# Altium PCB PCB1_ASCII.pcbdoc (part 2 of 3)
Units mm, origin at the board's own origin, x right, y up, seen from the top; angles counter-clockwise.
Board outline 135 x 100 mm, 4 copper layers (Top Layer, GND, VCC, Bottom Layer), stack 1.757 mm thick; 175 components, 160 nets, 705 pads, 758 vias.
Unrouted connection lines stored in the file: 8.
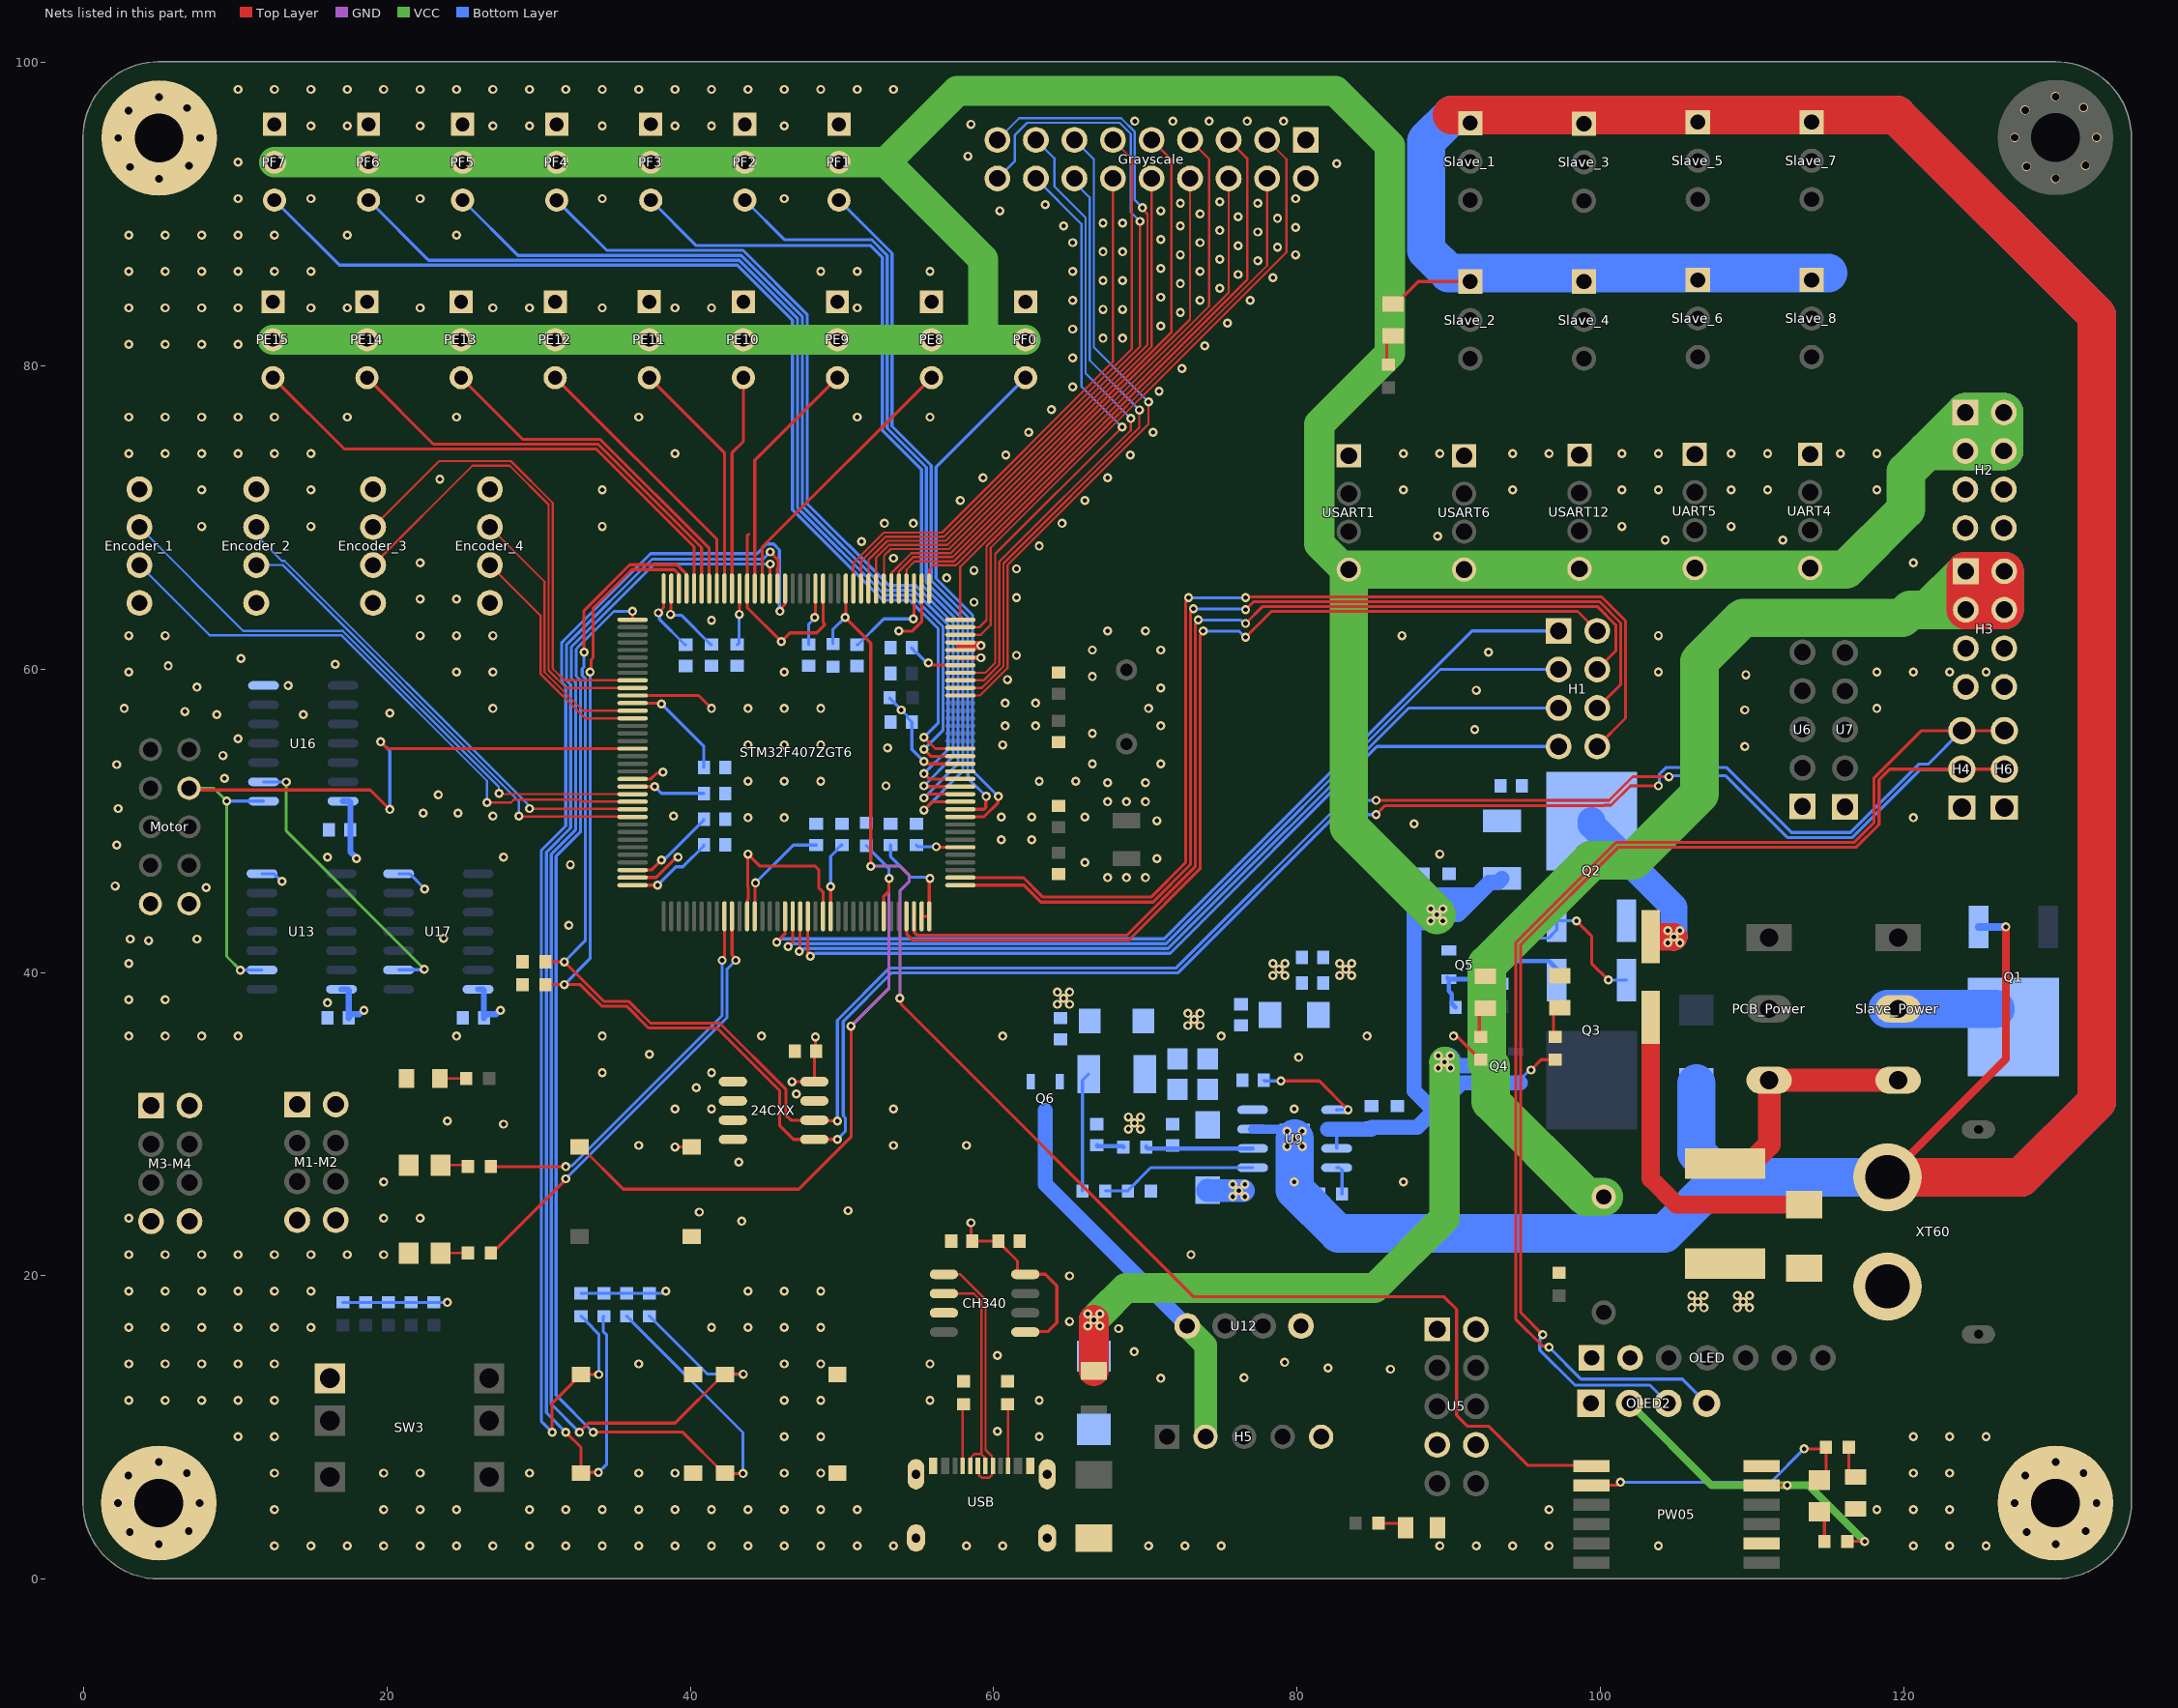
[diagram p4: the nets of this part, all layers, seen from the top]

## Via types
v1: diameter 0.6, hole 0.3, Top Layer to Bottom Layer, tented both sides, 722 vias
v2: diameter 0.6, hole 0.5, Top Layer to Bottom Layer, tented both sides, 24 vias
v3: diameter 0.6, hole 0.5, Top Layer to Bottom Layer, 8 vias
v4: diameter 0.61, hole 0.305, Top Layer to Bottom Layer, tented both sides, 4 vias

## Nets (pads, with @x,y where several pads share a name; then routed paths per layer and width w, separated by ;. In a path a pad name is that pad's centre, name@x,y a point inside that pad or via, vN(x,y) a via of type N, cw(c..) or ccw(c..) an arc to the next point about the centre after c; other vN are vias at no path point)
3V3A: C37.2 C38.2 Grayscale.1 L3.2 STM32F407ZGT6.32 STM32F407ZGT6.33 | length 1.4
  Top Layer w0.6: 57.803,61.539 v1(59.161,61.539)
  other v1: 82.8,39.8 83.6,39.8 83.2,40.2 82.8,40.6 83.6,40.6
3V3D: 24CXX.8 BOOT0.2 C7.2 C8.2 C9.2 C10.2 C11.2 C12.2 C13.2 C14.2 C15.2 C16.2 C17.2 C18.2 C19.2 C21.1 C33.2 C34.1 C35.1 C36.2 C39.1 C40.1 C41.1 CH340.5 CH340.8 D6.1 Encoder_1.1 Encoder_2.1 Encoder_3.1 Encoder_4.1 H3.1 H3.2 H3.3 H3.4 L2.2 L3.1 M1-M2.1 M1-M2.2 M3-M4.1 M3-M4.2 Motor.10 OLED2.2 OLED.2 OLED_Switch.1 PW05.5 Q6.2 R3.2 R6.2 R7.2 R8.2 R9.2 R10.2 R14.2 R16.2 R18.2 R19.2 R20.2 R21.2 R26.2 STM32F407ZGT6.6 STM32F407ZGT6.17 STM32F407ZGT6.30 STM32F407ZGT6.39 STM32F407ZGT6.52 STM32F407ZGT6.62 STM32F407ZGT6.72 STM32F407ZGT6.84 STM32F407ZGT6.95 STM32F407ZGT6.108 STM32F407ZGT6.121 STM32F407ZGT6.131 STM32F407ZGT6.143 STM32F407ZGT6.144 U5.7 U5.8 U13.14 U16.14 U17.14 | length 234.9
  Top Layer w0.2: STM32F407ZGT6.108@36.2,45.75 v1(37.85,45.75) ; STM32F407ZGT6.95@36.2,52.252 v1(37.652,52.252) ; STM32F407ZGT6.84@36.2,57.751 36.215,57.736 38.064,57.736 v1(38.1,57.7) ; v1(37.9,63.7) 38.25,64.05 STM32F407ZGT6.72@38.25,65.3 ; v1(39,28.5) BOOT0.2@40.101,28.5 ; v1(43.225,63.6) 43.238,63.613 43.238,65.287 STM32F407ZGT6.62@43.251,65.3 ; STM32F407ZGT6.121@44.249,43.7 44.264,43.715 44.264,45.864 v1(44.3,45.9) ; v1(46.7,32.8) 46.702,32.802 48.18,32.802 24CXX.8@48.182,32.805 48.182,34.684 C21.1@48.299,34.8 48.25,34.849 v1(48.25,35.75) ; v1(48.2,63.4) 48.25,63.45 STM32F407ZGT6.52@48.25,65.3 ; STM32F407ZGT6.131@49.25,43.7 v1(49.25,45.65) ; v1(54.7,63.3) 54.75,63.35 STM32F407ZGT6.39@54.75,65.3 ; STM32F407ZGT6.143@55.25,43.7 STM32F407ZGT6.144@55.75,43.7 55.75,46.15 v1(55.8,46.2) ; v1(55.4,53.9) 55.508,53.9 55.658,53.751 STM32F407ZGT6.17@57.8,53.751 ; v1(55.7,60.4) 55.808,60.4 55.958,60.251 STM32F407ZGT6.30@57.8,60.251 ; v1(56.215,48.285) 56.248,48.252 STM32F407ZGT6.6@57.8,48.252 ; v1(58.5,23.5) 58.5,22.399 C35.1@58.598,22.3 C34.1@60.301,22.3 60.301,22.25 61.565,20.987 61.565,20.304 61.764,20.105 CH340.8@62.082,20.105 63.395,20.105 64.163,19.338 64.163,16.913 63.589,16.339 62.127,16.339 CH340.5@62.082,16.295 ; v1(90.3,35.8) 90.377,35.723 90.597,35.723 92.072,34.248 R14.2@92.1,34.248 ; PW05.5@110.6,6.18 110.62,6.2 v1(112.3,6.2) ; R16.2@116.254,2.5 v1(117.4,2.5)
  Top Layer w2.54: H3.3@124.06,63.9 H3.4@126.6,63.9 H3.2@126.6,66.44 H3.1@124.06,66.44 H3.3@124.06,63.9
  VCC w0.5: OLED2.2@101.9,11.6 107.3,6.2 v1(112.3,6.2) 113.7,6.2 v1(117.4,2.5)
  VCC w2.54: OLED_Switch.1@100.2,25.21 99.04,25.21 92.75,31.5 92.75,33.828 92.5,34.078 92.5,40.5 99.382,47.382 102.132,47.382 106.5,51.75 106.5,60.5 109.37,63.37 119.87,63.37 120.4,63.9 121.52,63.9 ; 121.52,63.9 H3.3@124.06,63.9 ; 121.52,63.9 H3.1@124.06,66.44 ; H3.3@124.06,63.9 H3.1@124.06,66.44 ; H3.3@124.06,63.9 H3.4@126.6,63.9 H3.2@126.6,66.44 H3.1@124.06,66.44
  Bottom Layer w0.2: R9.2@17.1,18.254 R10.2@18.6,18.254 R7.2@20.1,18.254 R8.2@21.6,18.254 R6.2@23.1,18.254 23.104,18.25 v1(24,18.25) ; R18.2@32.8,18.854 R19.2@34.3,18.854 R21.2@35.8,18.854 R20.2@37.3,18.854 38.246,18.854 v1(38.392,19) ; v1(37.652,52.252) 37.652,52.248 38.1,51.8 C15.2@40.899,51.8 ; v1(37.85,45.75) 39.063,46.963 39.515,46.963 40.902,48.35 C16.2@40.902,48.4 ; v1(37.9,63.7) 37.977,63.623 37.977,63.272 39.65,61.599 C13.2@39.7,61.599 ; v1(38.1,57.7) 40.899,54.901 C14.2@40.899,53.5 ; C12.2@43.1,61.601 43.225,61.726 v1(43.225,63.6) ; v1(44.3,45.9) 46.799,48.399 C17.2@48.3,48.399 ; C11.2@47.8,61.601 47.8,62.951 48.2,63.351 v1(48.2,63.4) ; v1(49.25,45.65) 49.25,47.649 49.65,48.049 49.65,48.099 49.95,48.399 C18.2@50,48.399 ; C10.2@51,61.599 51.05,61.599 52.751,63.3 v1(54.7,63.3) ; R3.2@53.146,58.1 53.146,58.072 54.301,56.917 54.301,56.8 C8.2@54.601,56.5 54.601,54.699 v1(55.4,53.9) ; C19.2@53.2,48.402 53.2,47.635 54.559,46.277 55.723,46.277 v1(55.8,46.2) ; C9.2@54.598,61.4 54.598,61.35 54.899,61.05 54.948,61.05 55.598,60.4 v1(55.7,60.4) ; C7.2@54.9,48.402 55.017,48.285 v1(56.215,48.285) ; R26.2@65.848,25.6 65.848,32.897 L2.2@66.251,33.3
  Bottom Layer w0.4: U13.14@17.019,38.89 17.421,38.89 17.501,38.81 C39.1@17.501,37.05 ; U16.14@17.119,51.29 17.521,51.29 17.601,51.21 C40.1@17.601,49.4 17.601,47.953 18,47.554 v1(18,47.5) ; C39.1@17.501,37 C39.1@17.501,37.05 ; v1(18.5,37.5) 18.446,37.5 18.195,37.25 17.701,37.25 C39.1@17.501,37.05 ; U17.14@26.019,38.89 26.321,38.89 26.401,38.81 C41.1@26.401,37.05 ; C41.1@26.401,37 C41.1@26.401,37.05 ; v1(27.5,37.5) 27.446,37.5 27.195,37.25 26.601,37.25 C41.1@26.401,37.05
  other v1: 64.2,37.9 65,37.9 64.6,38.3 64.2,38.7 65,38.7 53.9,57.3
3V3IN: H5.2 Q6.3 U12.1 | length 25.9
  VCC w1.5: U12.1@72.751,16.7 72.751,16.646 73.96,15.437 H5.2@73.96,9.4
  Bottom Layer w1: Q6.3@63.4,30.9 Q6.3@63.4,30.598 63.4,26.051 U12.1@72.751,16.7
$1N10: C4.1 STM32F407ZGT6.106 | length 6.1
  Top Layer w0.2: STM32F407ZGT6.106@36.2,46.75 36.215,46.766 37.466,46.766 v1(38.1,47.4)
  Bottom Layer w0.2: v1(38.1,47.4) 38.177,47.477 38.325,47.477 40.899,50.05 C4.1@40.899,50.1
$1N11: C3.1 STM32F407ZGT6.71 | length 5.2
  Top Layer w0.2: v1(38.7,63.6) 38.735,63.635 38.735,65.285 STM32F407ZGT6.71@38.75,65.3
  Bottom Layer w0.2: v1(38.7,63.6) 38.748,63.552 39.4,63.552 41.35,61.601 C3.1@41.4,61.601
$1N48: F1.2 PCB_Power.3 Slave_Power.3 | length 16.2
  Top Layer w1.5: F1.2@108.2,27.399 109.851,27.399 111.1,28.648 PCB_Power.3@111.1,32.9 Slave_Power.3@119.6,32.9
$1N49: D1.1 F1.1 XT60.2
  other v1: 106,17.9 106.8,17.9 109,17.9 109.8,17.9 106.4,18.3 109.4,18.3 106,18.7 106.8,18.7 109,18.7 109.8,18.7
$1N52: C28.2 U9.1 | length 7.1
  Top Layer w0.2: v1(78.925,32.85) 81.45,32.85 v1(83.35,30.95)
  Bottom Layer w0.2: C28.2@77.801,32.9 77.851,32.85 v1(78.925,32.85) ; U9.1@82.6,30.94 82.61,30.95 v1(83.35,30.95)
$1N53: C28.1 C29.2 C32.2 D5.2 L2.1 U9.8
$1N54: R22.1 U9.4 | length 2
  Bottom Layer w0.2: U9.4@82.6,27.13 82.782,27.13 82.954,26.957 R22.1@82.954,25.4
$1N57: R26.1 R27.2 U9.5 | length 10.4
  Bottom Layer w0.2: R26.1@67.354,25.6 R27.2@68.848,25.6 68.848,25.628 70.35,27.13 U9.5@77.06,27.13
$1N58: C31.2 R25.1 | length 1.8
  Bottom Layer w0.3: C31.2@66.8,28.601 66.851,28.551 68.495,28.551 R25.1@68.546,28.5
$1N59: C30.2 R25.2 U9.6 | length 7
  Bottom Layer w0.3: R25.2@70.054,28.5 70.154,28.4 74.3,28.4 U9.6@77.06,28.4
$1N309: LED4.1 R12.1 | length 2.1
  Top Layer w0.2: R12.1@85.9,80.054 85.9,81.548 LED4.1@86.3,81.948
$1N314: LED5.1 R13.1 | length 1.9
  Top Layer w0.2: R13.1@85.354,3.7 86.848,3.7 LED5.1@87.148,3.4
$1N317: LED6.1 R14.1 | length 2.1
  Top Layer w0.2: R14.1@92,35.754 92,37.248 LED6.1@92.4,37.648
$1N321: LED7.2 R15.1 | length 1.7
  Top Layer w0.15: LED7.2@23.5,33 R15.1@25.246,33
$1N334: Q1.2 Slave_Power.2 | length 7.1
  Bottom Layer w2.54: Slave_Power.2@118.9,37.6 Q1.2@126.008,37.6
$1N339: LED3.1 R11.1 | length 2.1
  Top Layer w0.2: R11.1@96.9,35.787 96.9,37.281 LED3.1@97.3,37.681
$1N428: LED1.1 R4.1 | length 1.8
  Top Layer w0.15: LED1.1@23.552,27.3 25.246,27.3 R4.1@25.346,27.2
$1N431: LED2.1 R5.1 | length 1.8
  Top Layer w0.15: LED2.1@23.652,21.5 R5.1@25.446,21.5
$1N508: D3.1 F2.2 Q4.3 | length 45
  Top Layer w2: F2.2@66.6,13.745 v1(66.6,17.1)
  VCC w2: v1(66.6,17.1) v1(67,17.5) 68.7,19.2 85.1,19.2 89.7,23.8 v1(89.7,34.1)
  Bottom Layer w1: v1(89.7,34.1) 89.95,33.85 Q4.3@92.198,33.85 Q4.3@92.6,33.85
  Bottom Layer w2: D3.1@66.6,14.713 v1(66.6,17.1) ; v1(89.7,34.1) v1@89.8,34.1
  other v1: 66.2,16.7 67,16.7 66.2,17.5 89.3,33.7 90.1,33.7 89.3,34.5 90.1,34.5
$1N509: Q2.1 Q3.1 Q5.3 R32.1 | length 6.2
  Bottom Layer w0.3: Q5.3@91.998,40.5 92.122,40.624 93.376,40.624 R32.1@93.5,40.748 96.584,40.748 97.099,40.233 Q3.1@97.099,39.484
$1N510: Q5.1 R30.2 R31.1 | length 5.8
  Bottom Layer w0.3: Q5.1@89.901,39.648 Q5.1@89.999,39.55 ; R30.2@90.446,37.7 90.192,37.954 90.192,38.582 89.999,38.775 Q5.1@89.999,39.55 ; R31.1@93.5,39.252 92.06,39.252 91.762,39.55 Q5.1@89.999,39.55
$1N514: Q2.3 Q3.3 R32.2 | length 11.7
  Top Layer w0.2: v1(98.4,43.4) 99.4,42.4 99.4,40.6 v1(100.5,39.5)
  Bottom Layer w0.2: R32.2@93.5,42.254 96.55,42.254 97.1,42.805 Q2.3@97.1,43.4 v1(98.4,43.4) ; v1(100.5,39.5) 101.682,39.5 Q3.3@101.699,39.484
$1N515: C22.1 C23.2 L1.1 Q2.2 | length 11.1
  Top Layer w1.8: C22.1@103.65,42.35 v1(104.825,42.35)
  Bottom Layer w1.8: Q2.2@99.399,49.984 99.399,49.733 104.825,44.307 v1(104.825,42.35)
  other v1: 104.425,41.95 105.225,41.95 104.425,42.75 105.225,42.75
$1N522: LED8.2 PW05.8 R33.2 | length 18.8
  Top Layer w0.2: PW05.8@99.399,6.18 99.419,6.2 101.096,6.2 101.296,6.4 v1(101.3,6.4) ; v1(113.4,8.6) 114.746,8.6 R33.2@114.846,8.7 114.846,6.997 LED8.2@114.4,6.552
  Bottom Layer w0.2: v1(101.3,6.4) 111.2,6.4 v1(113.4,8.6)
$1N532: LED8.1 R16.1 | length 2.1
  Top Layer w0.2: LED8.1@114.4,4.451 114.746,4.105 R16.1@114.746,2.5
$1N534: LED9.1 R33.1 | length 2.2
  Top Layer w0.2: R33.1@116.352,8.7 116.352,7.149 116.752,6.749 LED9.1@116.8,6.749
$1N629: 
$1N630: 
+5V: C24.2 C25.2 C26.2 C27.2 H2.1 H2.2 H2.3 H2.4 L1.2 PE8.2 PE9.2 PE10.2 PE11.2 PE12.2 PE13.2 PE14.2 PE15.2 PF0.2 PF1.2 PF2.2 PF3.2 PF4.2 PF5.2 PF6.2 PF7.2 Q4.2 R11.2 U9.2 U9.3 UART4.4 UART5.4 USART1.4 USART6.4 USART12.4 | length 313.2
  Top Layer w0.2: v1(95.4,33.568) 96.081,34.248 R11.2@97,34.248
  VCC w2: PE15.2@12.5,81.7 59.3,81.7 ; PF7.2@12.6,93.4 PF6.2@18.8,93.4 PF5.2@25,93.4 PF4.2@31.2,93.4 PF3.2@37.4,93.4 PF2.2@43.6,93.4 PF1.2@49.8,93.4 52.9,93.4 ; PF0.2@62.1,81.7 59.3,81.7 ; USART1.4@83.4,66.551 83.141,66.551 81.45,68.243 81.45,76.15 86.1,80.8 86.1,94.5 82.5,98.1 57.6,98.1 52.9,93.4 ; 52.9,93.4 59.3,87 59.3,81.7
  VCC w2.54: v1(89.2,43.8) 83.4,49.6 USART1.4@83.4,66.551 USART6.4@91,66.551 116.151,66.551 120.115,70.515 120.115,72.995 121.49,74.37 ; 121.49,74.37 H2.1@124.03,76.91 ; 121.49,74.37 H2.3@124.03,74.37 ; H2.3@124.03,74.37 H2.1@124.03,76.91 ; H2.3@124.03,74.37 H2.4@126.57,74.37 H2.2@126.57,76.91 H2.1@124.03,76.91
  Bottom Layer w0.2: U9.3@82.6,28.4 U9.2@82.6,29.67 ; Q4.2@94.4,32.9 94.653,32.9 95.3,33.547 v1@95.3,33.6
  Bottom Layer w1: U9.2@82,29.67 U9.2@82.6,29.67 C27.2@84.9,29.67 ; C27.2@84.9,29.799 87.908,29.799 89.004,30.896 ; C24.2@90,45.101 90.5,45.1 ; C24.2@90,45.101 C25.2@88.3,45.101 87.7,44.501 87.7,32.2 89.004,30.896 ; L1.2@93.5,46.2 93.249,45.95 L1.2@92.75,45.95 ; Q4.2@94.7,32.73 90.839,32.73 89.004,30.896 ; 90.5,45.1 v1(89.6,44.2) v1(89.2,43.8) 90.601,43.8 L1.2@92.75,45.95 ; 90.5,45.1 91.8,45.1 92.65,45.95 L1.2@92.75,45.95
  Bottom Layer w2: 88.202,43.774 89.174,43.774 v1(89.2,43.8) 89.2,44.5 89.1,44.6
  Bottom Layer w2.54: H2.3@124.03,74.37 H2.1@124.03,76.91 H2.2@126.57,76.91 H2.4@126.57,74.37 H2.3@124.03,74.37
  other v1: 88.8,43.4 89.6,43.4 88.8,44.2
AD0: Grayscale.3 STM32F407ZGT6.34 | length 42.8
  Top Layer w0.15: STM32F407ZGT6.34@57.8,62.252 59.152,62.252 59.8,62.9 59.8,67.982 79.29,87.472 79.29,93.6 Grayscale.3@78.02,94.87
AD1: Grayscale.4 STM32F407ZGT6.35 | length 38.7
  Top Layer w0.15: STM32F407ZGT6.35@57.8,62.75 59.05,62.75 59.53,63.23 59.53,68.093 78.02,86.583 Grayscale.4@78.02,92.33
AD2: Grayscale.5 STM32F407ZGT6.36 | length 40
  Top Layer w0.15: STM32F407ZGT6.36@57.8,63.25 57.8,66.745 76.7,85.645 76.7,93.65 Grayscale.5@75.48,94.87
AD3: Grayscale.6 STM32F407ZGT6.37 | length 36.1
  Top Layer w0.15: STM32F407ZGT6.37@55.75,65.3 55.75,66.55 56.03,66.83 57.503,66.83 75.48,84.807 Grayscale.6@75.48,92.33
AD4: Grayscale.7 STM32F407ZGT6.40 | length 39.9
  Top Layer w0.15: STM32F407ZGT6.40@54.249,65.3 54.249,66.549 54.8,67.1 57.391,67.1 74.2,83.909 74.2,93.61 Grayscale.7@72.94,94.87
AD5: Grayscale.8 STM32F407ZGT6.41 | length 36.5
  Top Layer w0.15: STM32F407ZGT6.41@53.751,65.3 53.751,66.433 54.688,67.37 57.279,67.37 72.94,83.031 Grayscale.8@72.94,92.33
AD6: Grayscale.9 STM32F407ZGT6.42 | length 39.3
  Top Layer w0.15: STM32F407ZGT6.42@53.251,65.3 53.276,65.325 53.276,66.339 54.576,67.64 57.167,67.64 71.7,82.173 71.7,93.57 Grayscale.9@70.4,94.87
AD7: Grayscale.10 STM32F407ZGT6.43 | length 36.6
  Top Layer w0.15: STM32F407ZGT6.43@52.751,65.3 52.775,65.325 52.775,67.475 53.21,67.91 57.056,67.91 70.4,81.254 Grayscale.10@70.4,92.33
AD8: Grayscale.11 STM32F407ZGT6.46 | length 39.7
  Top Layer w0.15: STM32F407ZGT6.46@51.249,65.3 51.249,67.095 52.874,68.72 56.72,68.72 69.1,81.1 69.1,93.63 Grayscale.11@67.86,94.87
AD9: Grayscale.12 STM32F407ZGT6.47 | length 36.4
  Top Layer w0.15: STM32F407ZGT6.47@50.749,65.3 50.749,66.976 52.763,68.99 56.59,68.99 67.86,80.26 Grayscale.12@67.86,92.33
AD10: Grayscale.13 STM32F407ZGT6.26 | length 44.5
  Top Layer w0.15: STM32F407ZGT6.26@57.8,58.252 59.097,58.252 60.91,60.064 60.91,66.846 70.2,76.136 v1(70.2,77.6)
  Bottom Layer w0.15: Grayscale.13@65.32,94.87 66.6,93.59 66.6,81.2 v1(70.2,77.6)
AD11: Grayscale.14 STM32F407ZGT6.27 | length 41.1
  Top Layer w0.15: STM32F407ZGT6.27@57.8,58.752 59.216,58.752 60.64,60.176 60.64,66.958 69.595,75.913 v1(69.595,77.077)
  Bottom Layer w0.15: Grayscale.14@65.32,92.33 65.32,92.08 66.33,91.07 66.33,80.342 v1(69.595,77.077)
AD12: Grayscale.15 STM32F407ZGT6.28 | length 43.8
  Top Layer w0.15: STM32F407ZGT6.28@57.8,59.25 59.332,59.25 60.37,60.288 60.37,67.07 69.029,75.729 v1(69.029,76.511)
  Bottom Layer w0.15: Grayscale.15@62.78,94.87 64,93.65 64,91.8 66.06,89.74 66.06,79.48 v1(69.029,76.511)
AD13: Grayscale.16 STM32F407ZGT6.29 | length 40.3
  Top Layer w0.15: STM32F407ZGT6.29@57.8,59.75 57.802,59.748 59.448,59.748 60.1,60.4 60.1,67.582 v1(68.459,75.941)
  Bottom Layer w0.15: Grayscale.16@62.78,92.33 65.79,89.32 65.79,78.61 v1(68.459,75.941)
AD14: Grayscale.17 STM32F407ZGT6.44 | length 50.1
  Top Layer w0.15: STM32F407ZGT6.44@52.25,65.3 52.25,67.332 53.098,68.18 56.944,68.18 70.13,81.366 70.13,89.988 69.8,90.318 v1(69.8,90.4)
  Bottom Layer w0.15: Grayscale.17@60.243,94.87 61.673,96.3 68.4,96.3 69.3,95.4 69.3,90.9 v1(69.8,90.4)
AD15: Grayscale.18 STM32F407ZGT6.45 | length 51.5
  Top Layer w0.15: STM32F407ZGT6.45@51.75,65.3 51.75,67.213 52.986,68.45 56.832,68.45 69.635,81.253 v1(69.635,89.5)
  Bottom Layer w0.15: Grayscale.18@60.243,92.33 61.4,93.487 61.4,95.2 62.2,96 68.3,96 69.03,95.27 69.03,90.105 v1(69.635,89.5)
BOOT0: BOOT0.1 R2.1 STM32F407ZGT6.138 | length 44
  Top Layer w0.2: BOOT0.1@32.699,28.5 32.798,28.5 35.578,25.72 47.155,25.72 50.6,29.165 v1(50.6,36.46) ; STM32F407ZGT6.138@52.751,43.7 52.751,45.015 53.1,45.365 v1(53.1,46.2)
  GND w0.2: v1(50.6,36.46) 53.1,38.96 v1(53.1,46.2)
  Bottom Layer w0.2: R2.1@51.6,48.346 51.628,48.346 51.932,48.042 51.932,48.014 53.1,46.846 v1(53.1,46.2)
BOOT1_AT: PW05.7 R1.1 STM32F407ZGT6.48 | length 94.9
  Top Layer w0.2: STM32F407ZGT6.48@50.251,65.3 50.251,63.451 v1(50.2,63.4) 51.9,61.7 v1(51.9,47) ; v1(53.8,38.3) 53.877,38.223 53.877,37.929 73.185,18.62 89.68,18.62 90.5,17.8 90.5,10.8 91.2,10.1 92.617,10.1 95.217,7.5 99.349,7.5 PW05.7@99.399,7.45
  GND w0.2: v1(51.9,47) 53.835,47 54.42,46.415 54.42,45.985 53.835,45.4 53.835,38.335 v1(53.8,38.3)
  Bottom Layer w0.2: R1.1@49.4,61.654 49.4,62.6 v1(50.2,63.4)
CC1: R28.1 USB.A5 | length 4.1
  Top Layer w0.15: USB.A5@57.95,7.475 57.95,11.498 R28.1@58,11.548
CC2: R29.1 USB.B5 | length 4.1
  Top Layer w0.15: R29.1@60.9,11.548 60.95,11.498 USB.B5@60.95,7.475
Digital_IN1: PE8.3 STM32F407ZGT6.59 | length 18.5
  Top Layer w0.2: STM32F407ZGT6.59@44.75,65.3 44.75,68.05 PE8.3@55.9,79.201
Digital_IN2: PE9.3 STM32F407ZGT6.60 | length 16.2
  Top Layer w0.2: STM32F407ZGT6.60@44.249,65.3 44.249,73.75 PE9.3@49.7,79.201
Digital_IN3: PE10.3 STM32F407ZGT6.63 | length 14.2
  Top Layer w0.2: STM32F407ZGT6.63@42.751,65.3 42.751,74.251 43.5,75 PE10.3@43.5,79.201
Digital_IN4: PE11.3 STM32F407ZGT6.64 | length 16
  Top Layer w0.2: PE11.3@37.3,79.201 42.25,74.25 STM32F407ZGT6.64@42.25,65.3
Digital_IN5: PE12.3 STM32F407ZGT6.65 | length 18.3
  Top Layer w0.2: PE12.3@31.1,79.198 41.75,68.548 STM32F407ZGT6.65@41.75,65.3
Digital_IN6: PE13.3 STM32F407ZGT6.66 | length 23.7
  Top Layer w0.2: PE13.3@24.9,79.201 28.961,75.14 34.065,75.14 41.249,67.956 STM32F407ZGT6.66@41.249,65.3
Digital_IN7: PE14.3 STM32F407ZGT6.67 | length 29.4
  Top Layer w0.2: PE14.3@18.7,79.201 23.081,74.82 33.933,74.82 40.749,68.003 STM32F407ZGT6.67@40.749,65.3
Digital_IN8: PE15.3 STM32F407ZGT6.68 | length 35.1
  Top Layer w0.2: PE15.3@12.5,79.201 17.201,74.5 33.8,74.5 40.251,68.049 STM32F407ZGT6.68@40.251,65.3
Digital_IN9: PF0.3 STM32F407ZGT6.10 | length 35
  Top Layer w0.2: STM32F407ZGT6.10@57.8,50.251 57.815,50.266 59.366,50.266 60.276,51.176 60.276,51.576 v1(60.3,51.6)
  Bottom Layer w0.2: v1(60.3,51.6) 58.6,53.3 58.6,63.565 56.2,65.965 56.2,73.301 PF0.3@62.1,79.201
Digital_IN10: PF1.3 STM32F407ZGT6.11 | length 45.8
  Top Layer w0.2: STM32F407ZGT6.11@57.8,50.751 59.351,50.751 59.476,50.876 59.476,51.576 v1(59.5,51.6)
  Bottom Layer w0.2: PF1.3@49.8,90.901 53.3,87.401 53.3,76 55.88,73.42 55.88,65.832 58.28,63.432 58.28,53.167 58.3,53.147 58.3,52.8 v1(59.5,51.6)
Digital_IN11: PF2.3 STM32F407ZGT6.12 | length 53.2
  Top Layer w0.2: v1(55.4,50.7) 55.951,51.251 STM32F407ZGT6.12@57.8,51.251
  Bottom Layer w0.2: PF2.3@43.6,90.901 46.201,88.3 51.948,88.3 52.98,87.268 52.98,75.867 55.56,73.287 55.56,65.7 57.96,63.3 57.96,53.26 v1(55.4,50.7)
Digital_IN12: PF3.3 STM32F407ZGT6.13 | length 58
  Top Layer w0.2: v1(55.4,51.5) 55.508,51.5 55.76,51.752 STM32F407ZGT6.13@57.8,51.752
  Bottom Layer w0.2: PF3.3@37.4,90.901 40.401,87.9 51.896,87.9 52.66,87.136 52.66,75.735 55.24,73.155 55.24,65.567 57.64,63.167 57.64,53.74 v1(55.4,51.5)
Digital_IN13: PF4.3 STM32F407ZGT6.14 | length 58.9
  Top Layer w0.2: v1(55.4,52.3) 55.448,52.252 STM32F407ZGT6.14@57.8,52.252
  Bottom Layer w0.2: PF4.3@31.2,90.898 34.518,87.58 43.5,87.58 47.7,83.38 47.7,70.9 53.1,65.5 54.854,65.5 57.32,63.034 57.32,54.22 v1(55.4,52.3)
Digital_IN14: PF5.3 STM32F407ZGT6.15 | length 63.9
  Top Layer w0.2: v1(55.4,53.1) 55.75,52.75 STM32F407ZGT6.15@57.8,52.75
  Bottom Layer w0.2: PF5.3@25,90.901 28.641,87.26 43.367,87.26 47.38,83.247 47.38,70.767 52.967,65.18 54.722,65.18 56.99,62.912 56.99,54.69 v1(55.4,53.1)
Digital_IN15: PF6.3 STM32F407ZGT6.18 | length 68
  Top Layer w0.2: v1(55.4,54.7) 55.849,54.251 STM32F407ZGT6.18@57.8,54.251
  Bottom Layer w0.2: PF6.3@18.8,90.901 22.761,86.94 43.235,86.94 47.06,83.115 47.06,70.635 52.835,64.86 54.589,64.86 56.67,62.78 56.67,55.97 v1(55.4,54.7)
Digital_IN16: PF7.3 STM32F407ZGT6.19 | length 73
  Top Layer w0.2: v1(55.4,55.5) 56.149,54.751 STM32F407ZGT6.19@57.8,54.751
  Bottom Layer w0.2: PF7.3@12.6,90.901 16.881,86.62 43.102,86.62 46.74,82.982 46.74,70.502 52.702,64.54 54.457,64.54 56.35,62.647 56.35,56.45 v1(55.4,55.5)
Digital_OUT1: H1.2 STM32F407ZGT6.141 | length 65.7
  Top Layer w0.2: STM32F407ZGT6.141@54.249,43.7 54.264,43.685 54.264,42.536 54.67,42.13 68.893,42.13 73.6,46.837 73.6,62.192 73.8,62.392 v1(73.8,62.5) ; v1(76.6,62.1) 78.3,63.8 98.48,63.8 H1.2@99.77,62.51
  Bottom Layer w0.2: v1(73.8,62.5) 76.152,62.5 76.552,62.1 v1(76.6,62.1)
Digital_OUT2: H1.4 STM32F407ZGT6.142 | length 69.9
  Top Layer w0.2: STM32F407ZGT6.142@54.75,43.7 54.765,43.685 54.765,42.635 54.95,42.45 68.761,42.45 73.28,46.97 73.28,62.925 73.48,63.125 v1(73.48,63.234) ; v1(76.6,63) 77.72,64.12 99.78,64.12 101,62.9 101,61.2 H1.4@99.77,59.97
  Bottom Layer w0.2: v1(73.48,63.234) 76.258,63.234 76.492,63 v1(76.6,63)
Digital_OUT3: H1.6 STM32F407ZGT6.1 | length 68.8
  Top Layer w0.2: STM32F407ZGT6.1@57.8,45.75 61.993,45.75 63.102,44.64 70.498,44.64 72.96,47.102 72.96,63.659 73.16,63.859 v1(73.16,63.967) ; v1(76.6,63.9) 77.14,64.44 99.913,64.44 101.32,63.033 101.32,58.98 H1.6@99.77,57.43
  Bottom Layer w0.2: v1(73.16,63.967) 76.533,63.967 v1(76.6,63.9)
Digital_OUT4: H1.8 STM32F407ZGT6.2 | length 72.4
  Top Layer w0.2: STM32F407ZGT6.2@57.8,46.25 61.945,46.25 63.235,44.96 70.365,44.96 72.64,47.235 72.64,64.392 72.84,64.592 v1(72.84,64.7) ; v1(76.6,64.7) 76.66,64.76 100.045,64.76 101.64,63.165 101.64,56.76 H1.8@99.77,54.89
  Bottom Layer w0.2: v1(72.84,64.7) v1(76.6,64.7)
Digital_OUT5: H1.1 STM32F407ZGT6.125 | length 62
  Top Layer w0.2: v1(45.7,42) 46.236,42.536 46.236,43.685 STM32F407ZGT6.125@46.251,43.7
  Bottom Layer w0.2: v1(45.7,42) 45.797,42 46.017,42.22 71.231,42.22 91.521,62.51 H1.1@97.23,62.51
Digital_OUT6: H1.3 STM32F407ZGT6.126 | length 60.5
  Top Layer w0.2: v1(46.442,41.7) 46.442,41.708 46.751,42.017 STM32F407ZGT6.126@46.751,43.7
  Bottom Layer w0.2: v1(46.442,41.7) 46.55,41.7 46.75,41.9 71.363,41.9 89.433,59.97 H1.3@97.23,59.97
Digital_OUT7: H1.5 STM32F407ZGT6.127 | length 59.1
  Top Layer w0.2: v1(47.175,41.38) 47.234,41.439 47.234,43.685 STM32F407ZGT6.127@47.249,43.7
  Bottom Layer w0.2: v1(47.175,41.38) 47.283,41.38 47.483,41.58 71.496,41.58 87.346,57.43 H1.5@97.23,57.43
Digital_OUT8: H1.7 STM32F407ZGT6.128 | length 57.8
  Top Layer w0.2: STM32F407ZGT6.128@47.749,43.7 47.749,41.327 47.908,41.168 v1(47.908,41.06)
  Bottom Layer w0.2: v1(47.908,41.06) 48.016,41.06 48.216,41.26 71.629,41.26 85.258,54.89 H1.7@97.23,54.89
DN_N: CH340.2 USB.A7 USB.B7 | length 15
  Top Layer w0.15: CH340.2@56.718,18.835 58.683,18.835 59.194,18.324 59.194,8.25 ; USB.B7@58.451,7.475 58.526,7.55 58.526,8.067 58.708,8.25 59.194,8.25 ; USB.A7@59.451,7.475 59.377,7.55 59.377,8.067 59.194,8.25
DP_P: CH340.1 USB.A6 USB.B6 | length 16.8
  Top Layer w0.15: CH340.1@56.718,20.105 56.723,20.1 57.8,20.1 59.464,18.436 59.464,8.536 59.879,8.121 59.879,7.547 USB.B6@59.952,7.475 59.877,7.4 59.877,6.882 59.695,6.7 59.208,6.7 59.026,6.882 59.026,7.4 USB.A6@58.951,7.475
Encoder1_A: Encoder_1.2 STM32F407ZGT6.96 | length 40
  Top Layer w0.15: v1(27.4,51.8) 27.448,51.752 STM32F407ZGT6.96@36.2,51.752
  Bottom Layer w0.15: Encoder_1.2@3.7,69.35 10.55,62.5 17.118,62.5 27.388,52.23 27.388,51.812 v1(27.4,51.8)
Encoder1_B: Encoder_1.3 STM32F407ZGT6.97 | length 40
  Top Layer w0.15: v1(26.6,51.2) 28.2,51.2 28.4,51.4 32.673,51.4 32.822,51.251 STM32F407ZGT6.97@36.2,51.251
  Bottom Layer w0.15: Encoder_1.3@3.7,66.85 8.32,62.23 17.006,62.23 26.6,52.636 v1(26.6,51.2)
Encoder2_A: Encoder_2.2 STM32F407ZGT6.98 | length 32.9
  Top Layer w0.15: v1(29.4,50.8) 29.425,50.775 36.175,50.775 STM32F407ZGT6.98@36.2,50.751
  Bottom Layer w0.15: Encoder_2.2@11.4,69.35 11.696,69.053 11.696,68.504 13.08,67.12 13.262,67.12 29.27,51.112 29.27,51.052 29.4,50.922 v1(29.4,50.8)
Encoder2_B: Encoder_2.3 STM32F407ZGT6.99 | length 32.3
  Top Layer w0.15: v1(28.7,50.3) 28.725,50.275 36.175,50.275 STM32F407ZGT6.99@36.2,50.251
  Bottom Layer w0.15: Encoder_2.3@11.4,66.85 13.15,66.85 28.7,51.3 v1(28.7,50.3)
Encoder3_A: Encoder_3.2 STM32F407ZGT6.81 | length 31.3
  Top Layer w0.15: Encoder_3.2@19.1,69.35 23.45,73.7 28.182,73.7 30.94,70.942 30.94,60.024 31.714,59.25 STM32F407ZGT6.81@36.2,59.25
Encoder3_B: Encoder_3.3 STM32F407ZGT6.82 | length 32.3
  Top Layer w0.15: Encoder_3.3@19.1,66.85 25.65,73.4 28.1,73.4 30.67,70.83 30.67,59.912 31.83,58.752 STM32F407ZGT6.82@36.2,58.752
Encoder4_A: Encoder_4.2 STM32F407ZGT6.85 | length 17.9
  Top Layer w0.15: Encoder_4.2@26.8,69.35 30.4,65.75 30.4,59.8 32.949,57.251 STM32F407ZGT6.85@36.2,57.251
Encoder4_B: Encoder_4.3 STM32F407ZGT6.86 | length 15.8
  Top Layer w0.15: Encoder_4.3@26.8,66.85 30.13,63.52 30.13,59.688 33.068,56.75 STM32F407ZGT6.86@36.2,56.75
GND: 24CXX.1 24CXX.2 24CXX.3 24CXX.4 24CXX.7 C1.1 C2.1 C3.2 C4.2 C5.1 C6.1 C7.1 C8.1 C9.1 C10.1 C11.1 C12.1 C13.1 C14.1 C15.1 C16.1 C17.1 C18.1 C19.1 C20.1 C21.2 C22.2 C23.1 C24.1 C25.1 C26.1 C27.1 C29.1 C30.1 C31.1 C32.1 C33.1 C34.2 C35.2 C36.1 C37.1 C38.1 C39.2 C40.2 C41.2 CH340.3 D1.2 D2.2 D3.2 D5.1 D6.2 D7.2 Designator6.17 Designator8.17 Designator9.17 Encoder_1.4 Encoder_2.4 Encoder_3.4 Encoder_4.4 Grayscale.2 H2.5 H2.6 H2.7 H2.8 H3.5 H3.6 H3.7 H3.8 H4.1 H5.5 H6.1 KEY1.2 KEY2.2 KEY3.2 KEY4.2 LED1.2 LED2.2 LED3.2 LED4.2 LED5.2 LED6.2 LED7.1 LED9.2 M1-M2.7 M1-M2.8 M3-M4.7 M3-M4.8 Motor.9 NRST.2 OLED2.1 OLED.1 PE8.1 PE9.1 PE10.1 PE11.1 PE12.1 PE13.1 PE14.1 PE15.1 PF0.1 PF1.1 PF2.1 PF3.1 PF4.1 PF5.1 PF6.1 PF7.1 PW05.2 PW05.6 Q1.1 Q5.2 Q6.1 R1.2 R2.2 R17.1 R22.2 R23.2 R24.2 R27.1 R28.2 R29.2 R30.1 Slave_1.1 Slave_2.1 Slave_3.1 Slave_4.1 Slave_5.1 Slave_6.1 Slave_7.1 Slave_8.1 STM32F407ZGT6.16 STM32F407ZGT6.31 STM32F407ZGT6.38 STM32F407ZGT6.51 STM32F407ZGT6.61 STM32F407ZGT6.83 STM32F407ZGT6.94 STM32F407ZGT6.107 STM32F407ZGT6.120 STM32F407ZGT6.130 SW3.1 U5.1 U5.2 U6.1 U7.1 U9.7 U9.9 U12.4 U13.7 U16.7 U17.7 UART4.1 UART5.1 USART1.1 USART6.1 USART12.1 USB.13 USB.14 USB.A1B12 USB.B1A12 XT60.1 | length 420.6
  Top Layer w0.2: STM32F407ZGT6.107@36.2,46.25 36.215,46.265 37.757,46.265 39.092,47.6 v1(39.2,47.6) ; STM32F407ZGT6.94@36.2,52.75 37.415,52.75 37.788,53.123 38.123,53.123 v1(38.2,53.2) ; STM32F407ZGT6.83@36.2,58.252 40.548,58.252 v1(41.4,57.4) ; STM32F407ZGT6.120@43.751,43.7 43.767,43.715 43.767,44.769 43.82,44.822 43.82,45.645 43.78,45.685 43.78,47.78 v1(43.8,47.8) 44.6,47 48.25,47 48.467,46.783 48.467,45.584 48.75,45.301 STM32F407ZGT6.130@48.75,43.7 ; 43.852,68.88 43.751,68.78 STM32F407ZGT6.61@43.751,65.3 43.751,64.049 v1(46,61.8) 46.578,62.378 48.333,62.378 48.835,62.88 48.835,63 48.75,63.084 STM32F407ZGT6.51@48.75,65.3 ; v1(53.75,62.5) 54.635,62.5 55.25,63.115 STM32F407ZGT6.38@55.25,65.3 ; LED4.2@86.3,84.049 86.499,84.049 87.99,85.54 Slave_2.1@91.4,85.54
  Top Layer w0.3: STM32F407ZGT6.31@57.8,60.751 57.806,60.745 59.143,60.745 v1(59.149,60.739)
  Top Layer w0.5: XT60.1@118.9,26.502 126.7,34.301 v1(126.7,43)
  Top Layer w1.2: C22.2@103.3,37.03 103.3,26.4 105,24.7 113.393,24.7 D1.2@113.4,24.693
  Top Layer w2.54: 90.2,96.5 119.5,96.5 132.7,83.3 132.7,31.5 127.702,26.502 XT60.1@118.9,26.502
  Bottom Layer w0.2: U13.7@11.781,46.51 12.551,46.51 13.061,46 v1(13.1,46) ; U17.7@20.781,46.51 21.501,46.51 22.5,45.511 v1(22.5,45.5)
  Bottom Layer w0.5: Q1.1@124.901,42.992 124.909,43 v1(126.7,43)
  Bottom Layer w0.6: U9.7@77.06,29.67 79.196,29.67 v4(79.331,29.535) v1(79.831,29.035)
  Bottom Layer w1.5: D5.1@74.09,25.651 74.116,25.625 v1(76.15,25.625) 76.45,25.625
  Bottom Layer w2.54: v1(79.831,29.035) 79.831,25.679 82.711,22.8 104.2,22.8 107.902,26.502 ; D7.2@106.3,32.687 106.3,28.103 107.902,26.502 ; 115,86.1 89.988,86.1 88.5,87.588 88.5,94.8 90.2,96.5 119.5,96.5 132.7,83.3 132.7,31.5 127.702,26.502 XT60.1@118.9,26.502 107.902,26.502
  other v1: 12.6,2.2 15,2.2 17.4,2.2 19.8,2.2 22.2,2.2 24.6,2.2 27,2.2 29.4,2.2 31.8,2.2 34.2,2.2 36.6,2.2 39,2.2 41.4,2.2 43.8,2.2 46.2,2.2 48.6,2.2 51,2.2 53.4,2.2 58.2,2.2 60.6,2.2 70.2,2.2 72.6,2.2 75,2.2 89.4,2.2 91.8,2.2 94.2,2.2 96.6,2.2 103.8,2.2 120.6,2.2 123,2.2 125.4,2.2 12.6,4.6 19.8,4.6 22.2,4.6 24.6,4.6 29.4,4.6 31.8,4.6 34.2,4.6 36.6,4.6 39,4.6 41.4,4.6 43.8,4.6 46.2,4.6 48.6,4.6 51,4.6 96.6,4.6 118.2,4.6 120.6,4.6 123,4.6 12.6,7 19.8,7 22.2,7 29.4,7 36.6,7 39,7 46.2,7 48.6,7 120.6,7 123,7 10.2,9.4 12.6,9.4 46.2,9.4 48.6,9.4 63,9.4 120.6,9.4 123,9.4 125.4,9.4 60.25,9.75 3,11.8 5.4,11.8 7.8,11.8 10.2,11.8 12.6,11.8 46.2,11.8 48.6,11.8 55.8,11.8 63,11.8 71,13.25 76.5,13.301 86.15,13.85 82.025,13.925 3,14.2 5.4,14.2 7.8,14.2 10.2,14.2 12.6,14.2 36.6,14.2 46.2,14.2 48.6,14.2 55.8,14.2 79.175,14.3 60.25,14.75 69.25,15 68.225,16.525 3,16.6 5.4,16.6 7.8,16.6 10.2,16.6 12.6,16.6 15,16.6 41.4,16.6 43.8,16.6 46.2,16.6 48.6,16.6 65,17 3,19 5.4,19 7.8,19 10.2,19 12.6,19 15,19 43.8,19 46.2,19 48.6,19 65,20 3,21.4 5.4,21.4 7.8,21.4 10.2,21.4 12.6,21.4 15,21.4 17.4,21.4 19.8,21.4 73,21.4 43.4,23.6 3,23.8 19.8,23.8 22.2,23.8 40.6,24.2 50.4,24.3 75.75,25.225 76.55,25.225 75.75,26.025 76.55,26.025 19.8,26.2 79.8,26.2 87,26.2 43.2,27.5 36.6,28.6 53.4,28.6 58.2,28.6 68.875,29.675 69.675,29.675 27.7,30 69.275,30.075 24,30.2 68.875,30.475 69.675,30.475 39,31 41.4,31 53.4,31 79.8,31 47,32 40.4,32.4 34.2,33.4 41.4,33.4 80.1,34.4 37.3,34.6 3,35.8 5.4,35.8 7.8,35.8 10.2,35.8 24.6,35.8 34.2,35.8 44.7,35.8 60.6,35.8 75,35.8 84.6,35.8 72.8,36.5 73.6,36.5 73.2,36.9 72.8,37.3 73.6,37.3 16.1,38 3,38.2 5.4,38.2 78.4,39.8 79.2,39.8 78.8,40.2 3,40.6 78.4,40.6 79.2,40.6 4.3,42.1 3.1,42.2 7.5,42.2 23.75,42.25 32,43.1 8.1,45.6 2.1,45.7 67.5,46.25 68.75,46.25 70,46.25 32.1,47.1 66,47.25 70.75,47.5 16.1,47.6 27.7,47.6 89.4,47.8 2.2,48.4 60.5,48.75 62.5,48.75 87.7,49.8 70.75,50 43.8,50.2 46.2,50.2 120.6,50.2 60.5,50.25 62.5,50.25 66,50.25 27,50.3 38.9,50.3 22.4,50.5 24.7,50.5 2.3,50.8 67.5,51.25 68.75,51.25 70,51.25 23.4,51.7 52.9,52.3 67.5,52.5 70,52.5 43.8,52.6 46.2,52.6 48.6,52.6 63,52.6 65.4,52.6 9.3,52.8 2.2,53.7 66.5,53.75 71,53.75 9.2,54.3 53,54.8 109.5,54.9 43.8,55 46.2,55 48.6,55 60.6,55 10.2,55.4 66.5,55.75 91.7,56 60.75,56.25 62.75,56.25 71,56.25 8.8,57 14.5,57 20.2,57.1 6.7,57.2 109.5,57.3 2.7,57.4 27,57.4 43.8,57.4 46.2,57.4 48.6,57.4 70.2,57.4 118.2,57.4 60.75,57.75 62.75,57.75 91.8,58.6 71,58.75 7.5,58.8 13.5,58.9 60.9,59.3 66.5,59.5 109.568,59.621 3,59.8 24.6,59.8 27,59.8 46.2,59.8 103.8,59.8 118.2,59.8 120.6,59.8 123,59.8 125.4,59.8 5.6,60.2 16.6,60.3 10.4,60.7 61.5,60.9 92.6,61.1 66.5,61.25 71,61.25 3,62.2 5.4,62.2 22.2,62.2 24.6,62.2 27,62.2 86.9,62.2 103.8,62.2 67.5,62.5 70,62.5 41.4,63.2 58.7,64.4 22.2,64.6 24.6,64.6 61.5,64.7 56.9,66 58.7,66.5 61.5,66.6 22.2,67 120.6,67 53.4,67.3 63,68.1 51.3,68.4 104.25,68.5 112,68.5 89.25,68.75 7.8,69.4 15,69.4 34.2,69.4 101.4,69.4 108.6,69.4 52.8,69.6 54.7,69.6 64.5,69.6 57.8,71.1 66,71.1 7.8,71.8 15,71.8 34.2,71.8 87,71.8 94.2,71.8 101.4,71.8 103.8,71.8 108.6,71.8 111,71.8 118.2,71.8 23.5,72.5 59.3,72.6 67.5,72.6 60.8,74.1 69,74.1 3,74.2 5.4,74.2 7.8,74.2 10.2,74.2 12.6,74.2 15,74.2 39,74.2 87,74.2 89.4,74.2 94.2,74.2 96.6,74.2 101.4,74.2 103.8,74.2 108.6,74.2 111,74.2 115.8,74.2 118.2,74.2 62.3,75.6 70.5,75.6 3,76.6 5.4,76.6 7.8,76.6 10.2,76.6 12.6,76.6 17.4,76.6 24.6,76.6 36.6,76.6 51,76.6 55.8,76.6 63.8,77.1 70.9,78.3 65.2,78.6 72.4,79.8 65.2,80.5 73.9,81.3 3,81.4 5.4,81.4 7.8,81.4 10.2,81.4 67.2,81.8 68.5,81.8 65.2,82.4 71,82.6 75.4,82.8 72.3,83.5 67.2,83.7 68.5,83.7 3,83.8 5.4,83.8 7.8,83.8 10.2,83.8 15,83.8 17.4,83.8 22.2,83.8 27,83.8 29.4,83.8 34.2,83.8 39,83.8 41.4,83.8 51,83.8 65.2,84.3 73.6,84.3 76.9,84.3 71,84.5 74.9,85.1 72.3,85.4 67.2,85.6 68.5,85.6 78.4,85.8 76.1,86 3,86.2 5.4,86.2 7.8,86.2 10.2,86.2 12.6,86.2 15,86.2 48.6,86.2 51,86.2 55.8,86.2 65.2,86.2 73.6,86.2 71,86.4 77.4,86.9 74.9,87 72.3,87.3 79.9,87.3 67.2,87.5 68.5,87.5 78.7,87.8 76.1,87.9 65.2,88.1 73.6,88.1 71,88.3 3,88.6 5.4,88.6 7.8,88.6 10.2,88.6 12.6,88.6 17.4,88.6 24.6,88.6 77.4,88.8 74.9,88.9 79.9,89.1 64.6,89.2 72.3,89.2 67.2,89.4 68.5,89.4 78.7,89.7 76.1,89.8 73.6,90 60.4,90.2 71,90.2 63.4,90.6 72.3,90.7 77.4,90.7 74.9,90.8 10.2,91 15,91 22.2,91 34.2,91 46.2,91 79.9,91 82.6,93.3 10.2,93.4 58.3,93.8 15,95.8 17.4,95.8 22.2,95.8 27,95.8 29.4,95.8 34.2,95.8 39,95.8 41.4,95.8 46.2,95.8 58.5,95.9 69.3,96.1 71.8,96.1 74.2,96.1 76.7,96.1 79.1,96.1 10.2,98.2 12.6,98.2 15,98.2 17.4,98.2 19.8,98.2 22.2,98.2 24.6,98.2 27,98.2 29.4,98.2 31.8,98.2 34.2,98.2 36.6,98.2 39,98.2 41.4,98.2 43.8,98.2 46.2,98.2 48.6,98.2 51,98.2 53.4,98.2
  other v2: 4.977,2.328 129.977,2.328 3.068,3.119 128.068,3.119 6.954,3.188 131.954,3.188 2.277,5.028 7.677,5.028 127.277,5.028 132.677,5.028 2.971,6.834 127.971,6.834 6.82,7.002 131.82,7.002 4.977,7.728 129.977,7.728 5,92.3 3.091,93.091 6.976,93.16 2.3,95 7.7,95 2.993,96.806 6.842,96.974 5,97.7
  other v3: 129.977,92.328 128.068,93.119 131.954,93.188 127.277,95.028 132.677,95.028 127.971,96.834 131.82,97.002 129.977,97.728
  other v4: 79.331,28.535 80.332,28.535 80.332,29.535
I2C_SCL: 24CXX.6 H4.2 H6.2 OLED2.3 R23.1 STM32F407ZGT6.69 | length 224.3
  Top Layer w0.2: R23.1@30.452,40.701 30.453,40.7 v1(31.7,40.7) 34.3,38.1 35.947,38.1 37.387,36.66 41.94,36.66 46.3,32.3 46.3,30.6 46.635,30.265 24CXX.6@48.182,30.265 48.215,30.232 49.668,30.232 v1(49.7,30.2) ; v1(33,61.1) 33,63.853 36.017,66.87 39.13,66.87 39.736,66.264 39.736,65.315 STM32F407ZGT6.69@39.751,65.3 ; v1(85.2,51.34) 100.55,51.34 102.11,52.9 v1(104.5,52.9) ; v1(96.185,16.135) 94.72,17.6 94.72,41.815 101.165,48.26 116.85,48.26 118.34,49.75 118.34,52.687 119.053,53.4 H4.2@123.8,53.4 H6.2@126.6,53.4
  Bottom Layer w0.2: v1(31.7,40.7) 33.08,42.08 33.08,59.385 32.88,59.585 32.88,60.015 33,60.135 v1(33,61.1) ; v1(49.7,30.2) 49.7,36.853 53.147,40.3 72.026,40.3 83.066,51.34 v1(85.2,51.34) ; v1(96.185,16.135) 96.185,16.027 95.98,15.822 95.98,15.12 98.3,12.8 103.24,12.8 OLED2.3@104.44,11.6 ; v1(104.5,52.9) 104.56,52.96 108.24,52.96 112.3,48.9 116.585,48.9 121.085,53.4 H4.2@123.8,53.4
I2C_SDA: 24CXX.5 H4.3 H6.3 OLED2.4 R24.1 STM32F407ZGT6.70 | length 231.2
  Top Layer w0.2: R24.1@30.452,39.201 30.453,39.2 v1(31.7,39.2) 32.747,39.2 34.167,37.78 35.815,37.78 37.255,36.34 41.76,36.34 45.9,32.2 45.9,29.9 46.805,28.995 24CXX.5@48.182,28.995 48.185,28.998 49.698,28.998 v1(49.7,29) ; v1(33.4,59.8) 33.477,59.877 33.477,60.114 33.48,60.117 33.48,60.615 33.6,60.735 33.6,64 36.15,66.55 38.95,66.55 39.235,66.265 39.235,65.315 STM32F407ZGT6.70@39.25,65.3 ; v1(85.2,50.4) 85.8,51 100.2,51 100.22,51.02 100.683,51.02 101.963,52.3 v1(103.8,52.3) ; v1(96.6,15.3) 96.523,15.377 96.176,15.377 94.4,17.153 94.4,41.947 101.033,48.58 116.718,48.58 118.02,49.882 118.02,52.82 121.14,55.94 H4.3@123.8,55.94 H6.3@126.6,55.94
  Bottom Layer w0.2: v1(31.7,39.2) 33.4,40.9 v1(33.4,59.8) ; v1(49.7,29) 50.22,29.52 50.22,30.415 50.08,30.555 50.08,36.78 53.28,39.98 60.9,39.98 72.159,39.98 82.579,50.4 v1(85.2,50.4) ; v1(96.6,15.3) 98.7,13.2 105.38,13.2 OLED2.4@106.98,11.6 ; v1(103.8,52.3) 103.877,52.377 103.877,53.077 104.3,53.5 108.3,53.5 112.58,49.22 116.453,49.22 120.953,53.72 121.58,53.72 H4.3@123.8,55.94
KEY1: KEY1.1 R18.1 STM32F407ZGT6.56 | length 86.2
  Top Layer w0.2: v1(30.9,9.7) 30.9,11.601 32.3,13.001 32.3,13.1 32.7,13.5 KEY1.1@32.799,13.5 v1(33.975,13.5) ; v1(45.9,63.8) 45.9,63.908 46.236,64.244 46.236,65.285 STM32F407ZGT6.56@46.251,65.3
  Bottom Layer w0.2: v1(30.9,9.7) 30.2,10.4 30.2,48.057 31.8,49.657 31.8,58.854 31.52,59.134 31.52,61.713 31.68,61.873 31.68,61.885 37.351,67.556 37.356,67.556 37.4,67.6 44.4,67.6 45.036,68.236 45.485,68.236 45.88,67.841 45.88,63.82 v1(45.9,63.8) ; R18.1@32.8,17.346 32.828,17.346 33.132,17.042 33.132,17.014 33.975,16.171 v1(33.975,13.5)
KEY2: KEY2.1 R19.1 STM32F407ZGT6.57 | length 86.7
  Top Layer w0.2: v1(31.8,9.7) 32.799,8.701 KEY2.1@32.799,7 32.849,7.05 v1(33.95,7.05) ; v1(45.27,67.716) 45.79,67.196 45.79,66.684 45.75,66.644 STM32F407ZGT6.57@45.75,65.3
  Bottom Layer w0.2: v1(31.8,9.7) 30.52,10.98 30.52,47.925 32.12,49.525 32.12,58.987 31.84,59.267 31.84,61.58 32,61.74 32,61.753 37.484,67.236 44.79,67.236 v1(45.27,67.716) ; v1(33.95,7.05) 34.495,7.595 34.495,16.103 34.275,16.323 34.275,17.323 R19.1@34.3,17.348
KEY3: KEY3.1 R20.1 STM32F407ZGT6.58 | length 90.5
  Top Layer w0.2: v1(32.7,9.7) 33.3,10.3 39,10.3 42.2,13.5 43.475,13.5 v1(43.5,13.525) ; STM32F407ZGT6.58@45.25,65.3 45.26,65.31 45.26,66.906 v1(45.27,66.916)
  Bottom Layer w0.2: v1(32.7,9.7) 30.84,11.56 30.84,47.792 32.44,49.392 32.44,59.12 32.16,59.4 32.16,61.448 32.32,61.608 32.32,61.62 37.616,66.916 v1(45.27,66.916) ; R20.1@37.3,17.346 37.328,17.346 41.149,13.525 v1(43.5,13.525)
KEY4: KEY4.1 R21.1 STM32F407ZGT6.73 | length 83.3
  Top Layer w0.2: v1(33.6,9.7) 39.5,9.7 42.2,7 KEY4.1@42.299,7 42.324,6.975 v1(43.475,6.975) ; STM32F407ZGT6.73@36.2,63.25 v1(36.2,63.8)
  Bottom Layer w0.2: v1(33.6,9.7) 31.16,12.14 31.16,47.66 32.76,49.26 32.76,59.252 32.48,59.532 32.48,61.315 32.7,61.535 34.965,63.8 v1(36.2,63.8) ; R21.1@35.8,17.348 35.828,17.348 36.132,17.044 36.132,17.016 43.475,9.673 v1(43.475,6.975)
LED1: R4.2 STM32F407ZGT6.117 | length 26
  Top Layer w0.2: R4.2@26.852,27.2 v1(31.8,27.2) ; v1(42.1,40.8) 42.1,40.908 42.25,41.058 STM32F407ZGT6.117@42.25,43.7
  Bottom Layer w0.2: v1(31.8,27.2) 31.851,27.251 32.198,27.251 42.1,37.153 v1(42.1,40.8)
LED2: R5.2 STM32F407ZGT6.118 | length 29
  Top Layer w0.2: R5.2@26.952,21.5 26.952,21.528 27.256,21.832 27.284,21.832 31.8,26.348 v1(31.8,26.4) ; STM32F407ZGT6.118@42.751,43.7 42.751,41.158 43,40.908 v1(43,40.8)
  Bottom Layer w0.2: v1(31.8,26.4) 42.42,37.02 42.42,40.22 v1(43,40.8)
M1_Control: Motor.4 STM32F407ZGT6.90 U13.2 U16.1 | length 53.5
  Top Layer w0.2: Motor.4@6.97,52.14 7.08,52.03 18.91,52.03 v1(20.2,50.74) ; v1(19.6,55.2) 20.049,54.751 STM32F407ZGT6.90@36.2,54.751
  VCC w0.2: Motor.4@6.97,52.14 8.61,52.14 v1(9.45,51.3) 9.45,41.05 v1(10.35,40.15)
  Bottom Layer w0.2: v1(9.45,51.3) 9.455,51.295 11.876,51.295 U16.1@11.881,51.29 ; v1(10.35,40.15) 10.355,40.155 11.776,40.155 U13.2@11.781,40.16 ; v1(19.6,55.2) 20.2,54.6 v1(20.2,50.74)
M1_Control_R: U16.2 U17.2 | length 19.3
  VCC w0.2: v1(13.375,52.55) 13.375,49.325 22.475,40.225 v1(22.475,40.2)
  Bottom Layer w0.2: U16.2@11.881,52.56 13.24,52.56 13.25,52.55 v1(13.375,52.55) ; U17.2@20.781,40.16 20.801,40.18 22.455,40.18 v1(22.475,40.2)